# Altium PCB Board1.pcbdoc (part 1 of 2)
Units mil, origin at the board's own origin, x right, y up, seen from the top; angles counter-clockwise.
Board outline 3515.7 x 2641.7 mil, 2 copper layers (Top Layer, Bottom Layer), stack 62.2 mil thick; 78 components, 74 nets, 384 pads, 165 vias.
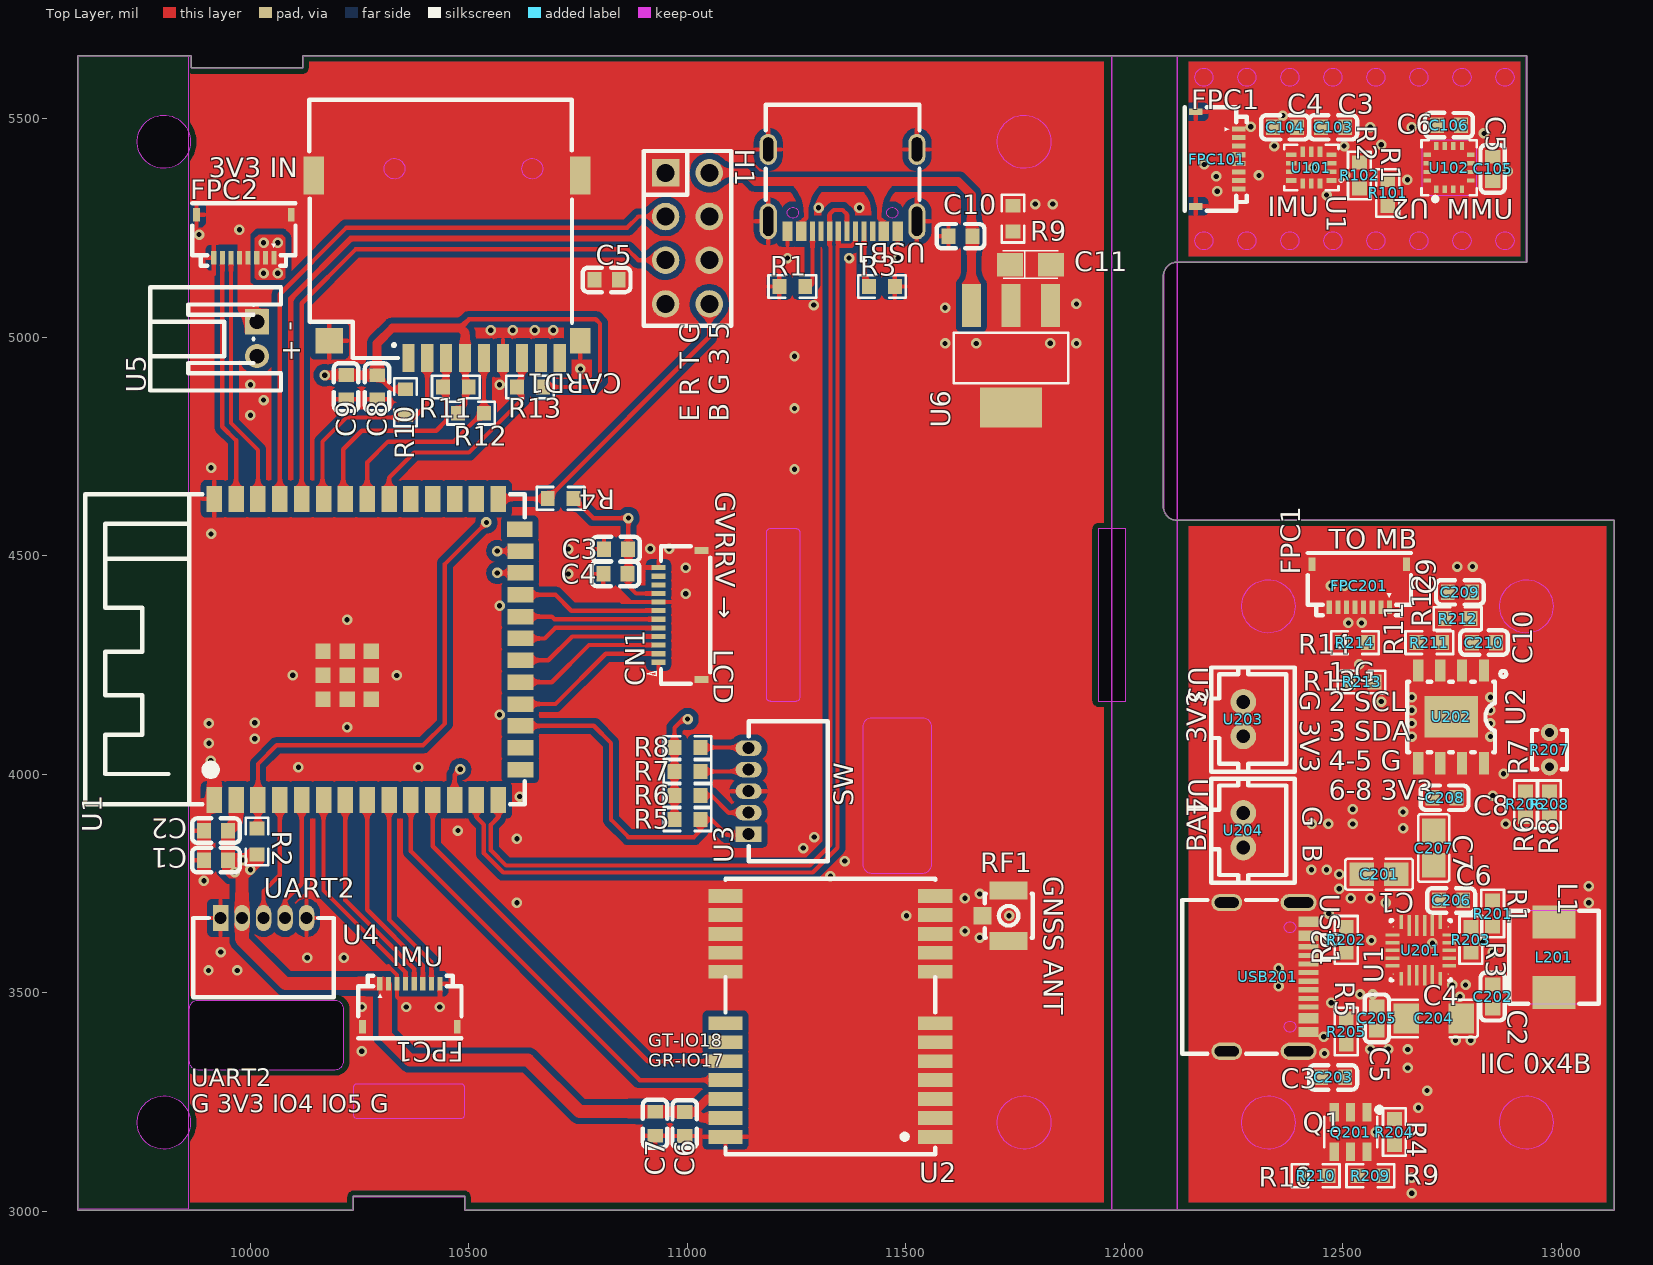
[diagram p0: Top Layer view]
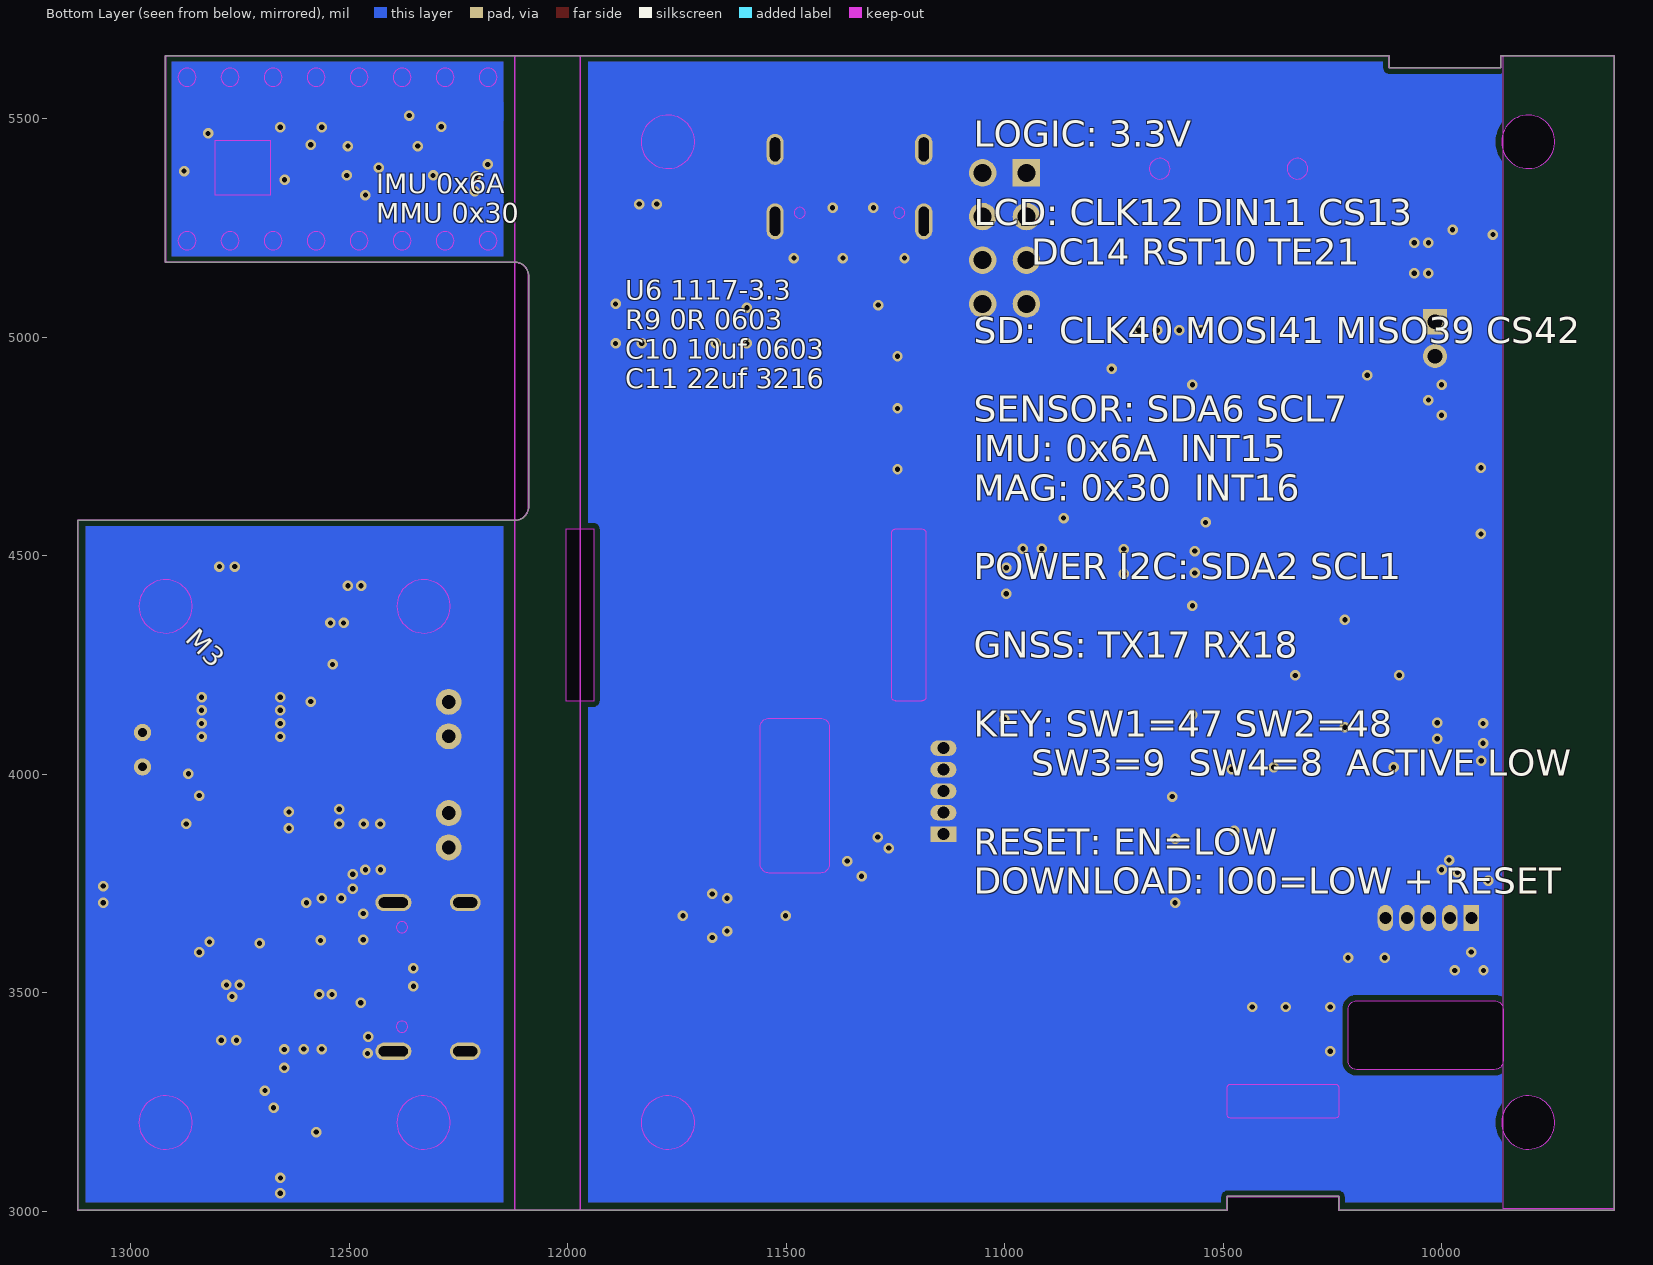
[diagram p1: Bottom Layer view, seen from below]

## Layer stack, top to bottom
Top Solder Mask Layer: solder mask 0.4, Dk 3.3
Top Layer: signal copper 1.4
Dielectric1: surface 59.4, FR4, Dk 4.5
Bottom Layer: signal copper 1.4
Bottom Solder Mask Layer: solder mask 0.4, Dk 3.3

## Board outline
9605,3002 9605,5643.7 9864.3,5643.7 9864.3,5616.1 10120.2,5616.1 10120.2,5643.7 12920,5643.7 12920,5171.3 12120.7,5171.3 ccw(c12120.7,5139.8) 12089.3,5139.8 12089.3,4612.2 ccw(c12120.7,4612.2) 12120.7,4580.7 13120.7,4580.7 13120.7,3002 10490.8,3002 10490.8,3033.5 10234.9,3033.5 10234.9,3002
cut-out: 9879,3481.5 ccw(c9879,3461.8) 9859.3,3461.8 9859.3,3343.7 ccw(c9879,3343.7) 9879,3324 10194,3324 ccw(c10194,3343.7) 10213.7,3343.7 10213.7,3461.8 ccw(c10194,3461.8) 10194,3481.5 9879,3481.5
cut-out: 11401.3,3793.4 ccw(c11420.9,3793.4) 11420.9,3773.7 11539.1,3773.7 ccw(c11539.1,3793.4) 11558.7,3793.4 11558.7,4108.4 ccw(c11539.1,4108.4) 11539.1,4128.1 11420.9,4128.1 ccw(c11420.9,4108.4) 11401.3,4108.4 11401.3,3793.4
cut-out: 11189.6,4561 ccw(c11189.6,4551.2) 11179.8,4551.2 11179.8,4177.2 ccw(c11189.6,4177.2) 11189.6,4167.3 11248.7,4167.3 ccw(c11248.7,4177.2) 11258.5,4177.2 11258.5,4551.2 ccw(c11248.7,4551.2) 11248.7,4561 11189.6,4561
cut-out: 10244.8,3290.9 ccw(c10244.8,3281.1) 10235,3281.1 10235,3222 ccw(c10244.8,3222) 10244.8,3212.2 10481.1,3212.2 ccw(c10481.1,3222) 10490.9,3222 10490.9,3281.1 ccw(c10481.1,3281.1) 10481.1,3290.9 10244.8,3290.9
cut-out: 11939.6,4561 11939.6,4167.3 12002.6,4167.3 12002.6,4561
cut-out: 9862.9,3202.8 9862.5,3195.8 9861.3,3188.9 9859.3,3182.2 9856.6,3175.8 9853.2,3169.8 9849.1,3164.1 9844.4,3159 9839.1,3154.4 9833.4,3150.5 9827.2,3147.2 9820.7,3144.7 9814,3142.9 9807.1,3142 9800.1,3141.8 9793.2,3142.4 9786.3,3143.7 9779.7,3145.9 9773.4,3148.8 9767.4,3152.4 9761.9,3156.6 9756.9,3161.5 9752.5,3166.9 9748.7,3172.7 9745.6,3179 9743.3,3185.6 9741.7,3192.4 9740.9,3199.3 9740.9,3206.2 9741.7,3213.2 9743.3,3219.9 9745.6,3226.5 9748.7,3232.8 9752.5,3238.6 9756.9,3244 9761.9,3248.9 9767.4,3253.1 9773.4,3256.7 9779.7,3259.6 9786.3,3261.8 9793.2,3263.2 9800.1,3263.8 9807.1,3263.6 9814,3262.6 9820.7,3260.8 9827.2,3258.3 9833.4,3255 9839.1,3251.1 9844.4,3246.5 9849.1,3241.4 9853.2,3235.7 9856.6,3229.7 9859.3,3223.3 9861.3,3216.6 9862.5,3209.7
cut-out: 9862.9,5446.9 9862.5,5439.9 9861.3,5433 9859.3,5426.3 9856.6,5419.9 9853.2,5413.9 9849.1,5408.2 9844.4,5403.1 9839.1,5398.5 9833.4,5394.6 9827.2,5391.3 9820.7,5388.8 9814,5387 9807.1,5386.1 9800.1,5385.9 9793.2,5386.4 9786.3,5387.8 9779.7,5390 9773.4,5392.9 9767.4,5396.5 9761.9,5400.7 9756.9,5405.6 9752.5,5411 9748.7,5416.8 9745.6,5423.1 9743.3,5429.7 9741.7,5436.4 9740.9,5443.4 9740.9,5450.3 9741.7,5457.3 9743.3,5464 9745.6,5470.6 9748.7,5476.9 9752.5,5482.7 9756.9,5488.1 9761.9,5493 9767.4,5497.2 9773.4,5500.8 9779.7,5503.7 9786.3,5505.9 9793.2,5507.3 9800.1,5507.8 9807.1,5507.7 9814,5506.7 9820.7,5504.9 9827.2,5502.4 9833.4,5499.1 9839.1,5495.2 9844.4,5490.6 9849.1,5485.5 9853.2,5479.8 9856.6,5473.8 9859.3,5467.4 9861.3,5460.7 9862.5,5453.8
cut-out: 11831.4,3202.8 11831,3195.8 11829.8,3188.9 11827.8,3182.2 11825.1,3175.8 11821.7,3169.8 11817.6,3164.1 11812.9,3159 11807.6,3154.4 11801.9,3150.5 11795.7,3147.2 11789.2,3144.7 11782.5,3142.9 11775.6,3142 11768.6,3141.8 11761.7,3142.4 11754.8,3143.7 11748.2,3145.9 11741.9,3148.8 11735.9,3152.4 11730.4,3156.6 11725.4,3161.5 11721,3166.9 11717.2,3172.7 11714.1,3179 11711.8,3185.6 11710.2,3192.4 11709.4,3199.3 11709.4,3206.2 11710.2,3213.2 11711.8,3219.9 11714.1,3226.5 11717.2,3232.8 11721,3238.6 11725.4,3244 11730.4,3248.9 11735.9,3253.1 11741.9,3256.7 11748.2,3259.6 11754.8,3261.8 11761.7,3263.2 11768.6,3263.8 11775.6,3263.6 11782.5,3262.6 11789.2,3260.8 11795.7,3258.3 11801.9,3255 11807.6,3251.1 11812.9,3246.5 11817.6,3241.4 11821.7,3235.7 11825.1,3229.7 11827.8,3223.3 11829.8,3216.6 11831,3209.7
cut-out: 11831.4,5446.9 11831,5439.9 11829.8,5433 11827.8,5426.3 11825.1,5419.9 11821.7,5413.9 11817.6,5408.2 11812.9,5403.1 11807.6,5398.5 11801.9,5394.6 11795.7,5391.3 11789.2,5388.8 11782.5,5387 11775.6,5386.1 11768.6,5385.9 11761.7,5386.4 11754.8,5387.8 11748.2,5390 11741.9,5392.9 11735.9,5396.5 11730.4,5400.7 11725.4,5405.6 11721,5411 11717.2,5416.8 11714.1,5423.1 11711.8,5429.7 11710.2,5436.4 11709.4,5443.4 11709.4,5450.3 11710.2,5457.3 11711.8,5464 11714.1,5470.6 11717.2,5476.9 11721,5482.7 11725.4,5488.1 11730.4,5493 11735.9,5497.2 11741.9,5500.8 11748.2,5503.7 11754.8,5505.9 11761.7,5507.3 11768.6,5507.8 11775.6,5507.7 11782.5,5506.7 11789.2,5504.9 11795.7,5502.4 11801.9,5499.1 11807.6,5495.2 11812.9,5490.6 11817.6,5485.5 11821.7,5479.8 11825.1,5473.8 11827.8,5467.4 11829.8,5460.7 11831,5453.8
cut-out: 12390.4,3202.8 12390,3195.8 12388.8,3188.9 12386.9,3182.2 12384.2,3175.8 12380.7,3169.8 12376.7,3164.1 12371.9,3159 12366.7,3154.4 12360.9,3150.5 12354.8,3147.2 12348.3,3144.7 12341.5,3142.9 12334.6,3142 12327.7,3141.8 12320.7,3142.4 12313.9,3143.7 12307.3,3145.9 12300.9,3148.8 12295,3152.4 12289.4,3156.6 12284.5,3161.5 12280,3166.9 12276.3,3172.7 12273.2,3179 12270.9,3185.6 12269.3,3192.4 12268.5,3199.3 12268.5,3206.2 12269.3,3213.2 12270.9,3219.9 12273.2,3226.5 12276.3,3232.8 12280,3238.6 12284.5,3244 12289.4,3248.9 12295,3253.1 12300.9,3256.7 12307.3,3259.6 12313.9,3261.8 12320.7,3263.2 12327.7,3263.8 12334.6,3263.6 12341.5,3262.6 12348.3,3260.8 12354.8,3258.3 12360.9,3255 12366.7,3251.1 12371.9,3246.5 12376.7,3241.4 12380.7,3235.7 12384.2,3229.7 12386.9,3223.3 12388.8,3216.6 12390,3209.7
cut-out: 12390.4,4383.9 12390,4376.9 12388.8,4370 12386.9,4363.4 12384.2,4356.9 12380.7,4350.9 12376.7,4345.2 12371.9,4340.1 12366.7,4335.5 12360.9,4331.6 12354.8,4328.3 12348.3,4325.8 12341.5,4324.1 12334.6,4323.1 12327.7,4322.9 12320.7,4323.5 12313.9,4324.8 12307.3,4327 12300.9,4329.9 12295,4333.5 12289.4,4337.7 12284.5,4342.6 12280,4348 12276.3,4353.9 12273.2,4360.1 12270.9,4366.7 12269.3,4373.5 12268.5,4380.4 12268.5,4387.3 12269.3,4394.3 12270.9,4401.1 12273.2,4407.6 12276.3,4413.9 12280,4419.7 12284.5,4425.1 12289.4,4430 12295,4434.2 12300.9,4437.8 12307.3,4440.7 12313.9,4442.9 12320.7,4444.3 12327.7,4444.9 12334.6,4444.7 12341.5,4443.7 12348.3,4441.9 12354.8,4439.4 12360.9,4436.1 12366.7,4432.2 12371.9,4427.6 12376.7,4422.5 12380.7,4416.9 12384.2,4410.8 12386.9,4404.4 12388.8,4397.7 12390,4390.8
cut-out: 12981,3202.8 12980.6,3195.8 12979.4,3188.9 12977.4,3182.2 12974.7,3175.8 12971.3,3169.8 12967.2,3164.1 12962.5,3159 12957.2,3154.4 12951.5,3150.5 12945.3,3147.2 12938.8,3144.7 12932.1,3142.9 12925.2,3142 12918.2,3141.8 12911.3,3142.4 12904.4,3143.7 12897.8,3145.9 12891.5,3148.8 12885.5,3152.4 12880,3156.6 12875,3161.5 12870.6,3166.9 12866.8,3172.7 12863.8,3179 12861.4,3185.6 12859.8,3192.4 12859,3199.3 12859,3206.2 12859.8,3213.2 12861.4,3219.9 12863.8,3226.5 12866.8,3232.8 12870.6,3238.6 12875,3244 12880,3248.9 12885.5,3253.1 12891.5,3256.7 12897.8,3259.6 12904.4,3261.8 12911.3,3263.2 12918.2,3263.8 12925.2,3263.6 12932.1,3262.6 12938.8,3260.8 12945.3,3258.3 12951.5,3255 12957.2,3251.1 12962.5,3246.5 12967.2,3241.4 12971.3,3235.7 12974.7,3229.7 12977.4,3223.3 12979.4,3216.6 12980.6,3209.7
cut-out: 12981,4383.9 12980.6,4376.9 12979.4,4370 12977.4,4363.4 12974.7,4356.9 12971.3,4350.9 12967.2,4345.2 12962.5,4340.1 12957.2,4335.5 12951.5,4331.6 12945.3,4328.3 12938.8,4325.8 12932.1,4324.1 12925.2,4323.1 12918.2,4322.9 12911.3,4323.5 12904.4,4324.8 12897.8,4327 12891.5,4329.9 12885.5,4333.5 12880,4337.7 12875,4342.6 12870.6,4348 12866.8,4353.9 12863.8,4360.1 12861.4,4366.7 12859.8,4373.5 12859,4380.4 12859,4387.3 12859.8,4394.3 12861.4,4401.1 12863.8,4407.6 12866.8,4413.9 12870.6,4419.7 12875,4425.1 12880,4430 12885.5,4434.2 12891.5,4437.8 12897.8,4440.7 12904.4,4442.9 12911.3,4444.3 12918.2,4444.9 12925.2,4444.7 12932.1,4443.7 12938.8,4441.9 12945.3,4439.4 12951.5,4436.1 12957.2,4432.2 12962.5,4427.6 12967.2,4422.5 12971.3,4416.9 12974.7,4410.8 12977.4,4404.4 12979.4,4397.7 12980.6,4390.8
cut-out: 12202.4,5594.5 12202,5590.5 12200.9,5586.6 12199,5583 12196.4,5579.9 12193.3,5577.3 12189.7,5575.4 12185.8,5574.2 12181.8,5573.8 12177.7,5574.2 12173.9,5575.4 12170.3,5577.3 12167.2,5579.9 12164.6,5583 12162.7,5586.6 12161.5,5590.5 12161.1,5594.5 12161.5,5598.5 12162.7,5602.4 12164.6,5606 12167.2,5609.1 12170.3,5611.7 12173.9,5613.6 12177.7,5614.8 12181.8,5615.2 12185.8,5614.8 12189.7,5613.6 12193.3,5611.7 12196.4,5609.1 12199,5606 12200.9,5602.4 12202,5598.5
cut-out: 12202.4,5220.5 12202,5216.4 12200.9,5212.6 12199,5209 12196.4,5205.9 12193.3,5203.3 12189.7,5201.4 12185.8,5200.2 12181.8,5199.8 12177.7,5200.2 12173.9,5201.4 12170.3,5203.3 12167.2,5205.9 12164.6,5209 12162.7,5212.6 12161.5,5216.4 12161.1,5220.5 12161.5,5224.5 12162.7,5228.4 12164.6,5232 12167.2,5235.1 12170.3,5237.7 12173.9,5239.6 12177.7,5240.7 12181.8,5241.1 12185.8,5240.7 12189.7,5239.6 12193.3,5237.7 12196.4,5235.1 12199,5232 12200.9,5228.4 12202,5224.5
cut-out: 12891.4,5220.5 12891,5216.4 12889.8,5212.6 12887.9,5209 12885.4,5205.9 12882.2,5203.3 12878.7,5201.4 12874.8,5200.2 12870.7,5199.8 12866.7,5200.2 12862.8,5201.4 12859.3,5203.3 12856.1,5205.9 12853.6,5209 12851.7,5212.6 12850.5,5216.4 12850.1,5220.5 12850.5,5224.5 12851.7,5228.4 12853.6,5232 12856.1,5235.1 12859.3,5237.7 12862.8,5239.6 12866.7,5240.7 12870.7,5241.1 12874.8,5240.7 12878.7,5239.6 12882.2,5237.7 12885.4,5235.1 12887.9,5232 12889.8,5228.4 12891,5224.5
cut-out: 12891.4,5594.5 12891,5590.5 12889.8,5586.6 12887.9,5583 12885.4,5579.9 12882.2,5577.3 12878.7,5575.4 12874.8,5574.2 12870.7,5573.8 12866.7,5574.2 12862.8,5575.4 12859.3,5577.3 12856.1,5579.9 12853.6,5583 12851.7,5586.6 12850.5,5590.5 12850.1,5594.5 12850.5,5598.5 12851.7,5602.4 12853.6,5606 12856.1,5609.1 12859.3,5611.7 12862.8,5613.6 12866.7,5614.8 12870.7,5615.2 12874.8,5614.8 12878.7,5613.6 12882.2,5611.7 12885.4,5609.1 12887.9,5606 12889.8,5602.4 12891,5598.5
cut-out: 12300.9,5220.5 12300.5,5216.4 12299.3,5212.6 12297.4,5209 12294.8,5205.9 12291.7,5203.3 12288.1,5201.4 12284.2,5200.2 12280.2,5199.8 12276.2,5200.2 12272.3,5201.4 12268.7,5203.3 12265.6,5205.9 12263,5209 12261.1,5212.6 12259.9,5216.4 12259.5,5220.5 12259.9,5224.5 12261.1,5228.4 12263,5232 12265.6,5235.1 12268.7,5237.7 12272.3,5239.6 12276.2,5240.7 12280.2,5241.1 12284.2,5240.7 12288.1,5239.6 12291.7,5237.7 12294.8,5235.1 12297.4,5232 12299.3,5228.4 12300.5,5224.5
cut-out: 12399.3,5220.5 12398.9,5216.4 12397.7,5212.6 12395.8,5209 12393.2,5205.9 12390.1,5203.3 12386.5,5201.4 12382.7,5200.2 12378.6,5199.8 12374.6,5200.2 12370.7,5201.4 12367.1,5203.3 12364,5205.9 12361.4,5209 12359.5,5212.6 12358.3,5216.4 12358,5220.5 12358.3,5224.5 12359.5,5228.4 12361.4,5232 12364,5235.1 12367.1,5237.7 12370.7,5239.6 12374.6,5240.7 12378.6,5241.1 12382.7,5240.7 12386.5,5239.6 12390.1,5237.7 12393.2,5235.1 12395.8,5232 12397.7,5228.4 12398.9,5224.5
cut-out: 12497.7,5220.5 12497.3,5216.4 12496.1,5212.6 12494.2,5209 12491.7,5205.9 12488.5,5203.3 12485,5201.4 12481.1,5200.2 12477,5199.8 12473,5200.2 12469.1,5201.4 12465.6,5203.3 12462.4,5205.9 12459.9,5209 12458,5212.6 12456.8,5216.4 12456.4,5220.5 12456.8,5224.5 12458,5228.4 12459.9,5232 12462.4,5235.1 12465.6,5237.7 12469.1,5239.6 12473,5240.7 12477,5241.1 12481.1,5240.7 12485,5239.6 12488.5,5237.7 12491.7,5235.1 12494.2,5232 12496.1,5228.4 12497.3,5224.5
cut-out: 12694.6,5220.5 12694.2,5216.4 12693,5212.6 12691.1,5209 12688.5,5205.9 12685.4,5203.3 12681.8,5201.4 12677.9,5200.2 12673.9,5199.8 12669.9,5200.2 12666,5201.4 12662.4,5203.3 12659.3,5205.9 12656.7,5209 12654.8,5212.6 12653.6,5216.4 12653.2,5220.5 12653.6,5224.5 12654.8,5228.4 12656.7,5232 12659.3,5235.1 12662.4,5237.7 12666,5239.6 12669.9,5240.7 12673.9,5241.1 12677.9,5240.7 12681.8,5239.6 12685.4,5237.7 12688.5,5235.1 12691.1,5232 12693,5228.4 12694.2,5224.5
cut-out: 12793,5220.5 12792.6,5216.4 12791.4,5212.6 12789.5,5209 12786.9,5205.9 12783.8,5203.3 12780.2,5201.4 12776.4,5200.2 12772.3,5199.8 12768.3,5200.2 12764.4,5201.4 12760.8,5203.3 12757.7,5205.9 12755.1,5209 12753.2,5212.6 12752.1,5216.4 12751.7,5220.5 12752.1,5224.5 12753.2,5228.4 12755.1,5232 12757.7,5235.1 12760.8,5237.7 12764.4,5239.6 12768.3,5240.7 12772.3,5241.1 12776.4,5240.7 12780.2,5239.6 12783.8,5237.7 12786.9,5235.1 12789.5,5232 12791.4,5228.4 12792.6,5224.5
cut-out: 12596.1,5220.5 12595.7,5216.4 12594.6,5212.6 12592.7,5209 12590.1,5205.9 12587,5203.3 12583.4,5201.4 12579.5,5200.2 12575.5,5199.8 12571.4,5200.2 12567.6,5201.4 12564,5203.3 12560.9,5205.9 12558.3,5209 12556.4,5212.6 12555.2,5216.4 12554.8,5220.5 12555.2,5224.5 12556.4,5228.4 12558.3,5232 12560.9,5235.1 12564,5237.7 12567.6,5239.6 12571.4,5240.7 12575.5,5241.1 12579.5,5240.7 12583.4,5239.6 12587,5237.7 12590.1,5235.1 12592.7,5232 12594.6,5228.4 12595.7,5224.5
cut-out: 12300.9,5594.5 12300.5,5590.5 12299.3,5586.6 12297.4,5583 12294.8,5579.9 12291.7,5577.3 12288.1,5575.4 12284.2,5574.2 12280.2,5573.8 12276.2,5574.2 12272.3,5575.4 12268.7,5577.3 12265.6,5579.9 12263,5583 12261.1,5586.6 12259.9,5590.5 12259.5,5594.5 12259.9,5598.5 12261.1,5602.4 12263,5606 12265.6,5609.1 12268.7,5611.7 12272.3,5613.6 12276.2,5614.8 12280.2,5615.2 12284.2,5614.8 12288.1,5613.6 12291.7,5611.7 12294.8,5609.1 12297.4,5606 12299.3,5602.4 12300.5,5598.5
cut-out: 12399.3,5594.5 12398.9,5590.5 12397.7,5586.6 12395.8,5583 12393.2,5579.9 12390.1,5577.3 12386.5,5575.4 12382.7,5574.2 12378.6,5573.8 12374.6,5574.2 12370.7,5575.4 12367.1,5577.3 12364,5579.9 12361.4,5583 12359.5,5586.6 12358.3,5590.5 12358,5594.5 12358.3,5598.5 12359.5,5602.4 12361.4,5606 12364,5609.1 12367.1,5611.7 12370.7,5613.6 12374.6,5614.8 12378.6,5615.2 12382.7,5614.8 12386.5,5613.6 12390.1,5611.7 12393.2,5609.1 12395.8,5606 12397.7,5602.4 12398.9,5598.5
cut-out: 12497.7,5594.5 12497.3,5590.5 12496.1,5586.6 12494.2,5583 12491.7,5579.9 12488.5,5577.3 12485,5575.4 12481.1,5574.2 12477,5573.8 12473,5574.2 12469.1,5575.4 12465.6,5577.3 12462.4,5579.9 12459.9,5583 12458,5586.6 12456.8,5590.5 12456.4,5594.5 12456.8,5598.5 12458,5602.4 12459.9,5606 12462.4,5609.1 12465.6,5611.7 12469.1,5613.6 12473,5614.8 12477,5615.2 12481.1,5614.8 12485,5613.6 12488.5,5611.7 12491.7,5609.1 12494.2,5606 12496.1,5602.4 12497.3,5598.5
cut-out: 12596.1,5594.5 12595.7,5590.5 12594.6,5586.6 12592.7,5583 12590.1,5579.9 12587,5577.3 12583.4,5575.4 12579.5,5574.2 12575.5,5573.8 12571.4,5574.2 12567.6,5575.4 12564,5577.3 12560.9,5579.9 12558.3,5583 12556.4,5586.6 12555.2,5590.5 12554.8,5594.5 12555.2,5598.5 12556.4,5602.4 12558.3,5606 12560.9,5609.1 12564,5611.7 12567.6,5613.6 12571.4,5614.8 12575.5,5615.2 12579.5,5614.8 12583.4,5613.6 12587,5611.7 12590.1,5609.1 12592.7,5606 12594.6,5602.4 12595.7,5598.5
cut-out: 12694.6,5594.5 12694.2,5590.5 12693,5586.6 12691.1,5583 12688.5,5579.9 12685.4,5577.3 12681.8,5575.4 12677.9,5574.2 12673.9,5573.8 12669.9,5574.2 12666,5575.4 12662.4,5577.3 12659.3,5579.9 12656.7,5583 12654.8,5586.6 12653.6,5590.5 12653.2,5594.5 12653.6,5598.5 12654.8,5602.4 12656.7,5606 12659.3,5609.1 12662.4,5611.7 12666,5613.6 12669.9,5614.8 12673.9,5615.2 12677.9,5614.8 12681.8,5613.6 12685.4,5611.7 12688.5,5609.1 12691.1,5606 12693,5602.4 12694.2,5598.5
cut-out: 12793,5594.5 12792.6,5590.5 12791.4,5586.6 12789.5,5583 12786.9,5579.9 12783.8,5577.3 12780.2,5575.4 12776.4,5574.2 12772.3,5573.8 12768.3,5574.2 12764.4,5575.4 12760.8,5577.3 12757.7,5579.9 12755.1,5583 12753.2,5586.6 12752.1,5590.5 12751.7,5594.5 12752.1,5598.5 12753.2,5602.4 12755.1,5606 12757.7,5609.1 12760.8,5611.7 12764.4,5613.6 12768.3,5614.8 12772.3,5615.2 12776.4,5614.8 12780.2,5613.6 12783.8,5611.7 12786.9,5609.1 12789.5,5606 12791.4,5602.4 12792.6,5598.5

## Design rules (kind name [scope] priority, off if disabled: settings)
BoardOutlineClearance copperThickness1oz [All] p0: genericclearance=10 ignorepadtopadclearanceinfootprint=FALSE except(0: Arc-SplitContinuation Track-SplitContinuation SMDPad-SplitContinuation THPad-SplitContinuation Via-SplitContinuation Fill-SplitContinuation Poly-SplitContinuation Region-SplitContinuation Text-SplitContinuation)
BoardOutlineClearance copperThickness2oz [All] p0: genericclearance=10 ignorepadtopadclearanceinfootprint=FALSE except(0: Arc-SplitContinuation Track-SplitContinuation SMDPad-SplitContinuation THPad-SplitContinuation Via-SplitContinuation Fill-SplitContinuation Poly-SplitContinuation Region-SplitContinuation Text-SplitContinuation)
BoardOutlineClearance otherClearance [All] p0: genericclearance=10 ignorepadtopadclearanceinfootprint=FALSE except(0: Arc-SplitContinuation Track-SplitContinuation SMDPad-SplitContinuation THPad-SplitContinuation Via-SplitContinuation Fill-SplitContinuation Poly-SplitContinuation Region-SplitContinuation Text-SplitContinuation)
Clearance copperThickness1oz [All] p1: gap=7 ignorepadtopadclearanceinfootprint=FALSE
Clearance copperThickness2oz [All] p1: gap=7 ignorepadtopadclearanceinfootprint=FALSE
Clearance otherClearance [All] p1: gap=7 ignorepadtopadclearanceinfootprint=FALSE
DiffPairsRouting differentialPair [All] p1: maxuncoupledlength=10 minlimit=6 maxlimit=Infinity mostfreqgap=6 toplayer_minwidth=5 toplayer_prefwidth=10 toplayer_maxwidth=100 bottomlayer_minwidth=5 bottomlayer_prefwidth=10 bottomlayer_maxwidth=100
PasteMaskExpansion pasteMaskExpansion [All] p1: expansion=0
PlaneConnect innerPlane [All] p1: planeconnectstyle=Relief reliefexpansion=20 reliefentries=4 reliefconductorwidth=10 reliefairgap=10
PolygonConnect copperRegion [All] p1: connectstyle=Relief reliefentries=4 reliefconductorwidth=10 polygonreliefangle="90 Angle" airgapwidth=10
PolygonConnect copperRegion1 [All] p1: connectstyle=Direct reliefentries=4 reliefconductorwidth=10 polygonreliefangle="90 Angle" airgapwidth=10
RoutingVias viaSize [All] p1: viastyle="Through Hole" holewidth=12.0078 minholewidth=11.811 maxholewidth=248.0314 width=12.0078 minwidth=11.811 maxwidth=248.0314
SolderMaskExpansion solderMaskExpansion [IsVia] p1: useseparateexpansions=TRUE expansion=-1000 expansionbottom=-1000
SolderMaskExpansion solderMaskExpansion [All] p2: useseparateexpansions=TRUE expansion=2 expansionbottom=2
Width copperThickness1oz [All] p1: maxlimit=100 minlimit=5 preferedwidth=10
Width copperThickness2oz [All] p1: maxlimit=100 minlimit=8 preferedwidth=10

## Components (designator, comment, footprint, x,y, rotation, side; value= is the part's Value field where it differs from the comment)
C1 "10uF" C0603#1 9921.2,3803.2 r180 top
C2 "100nF" C0603#1 9921.2,3870.8 r180 top
C3 "100nF" C0603#1 10836.6,4515 r0 top
C4 "10uF" C0603#2 10835.4,4458 r0 top
C5 "10uF" C0603#3 10815,5130.9 r0 top
C6 "100nF" C0603#1 10993.7,3199.4 r90 top
C7 "10uF" C0603#2 10926,3200.1 r90 top
C8 "10uF" C0603#3 10289.9,4885.3 r90 top
C9 "100nF" C0603#2 10218.9,4885.6 r90 top
C10 "10uF" C0603#3 11625,5230.9 r0 top
C11 "22uF" CASE-A_3216 11785,5165.9 r0 top
C103 "100nF" C0603#2 12477.6,5480 r0 top
C104 "100nF" C0603#1 12367.6,5480 r180 top
C105 "1uF" C0603#3 12842.6,5385 r270 top
C106 "10uF" C0603#2 12742.6,5485 r0 top
C201 "22uF" C0805#1 12582.6,3770.9 r180 top
C202 "47nF" C0603#3 12842.6,3490.9 r90 top
C203 "1uF" C0603#1 12477.6,3305.9 r180 top
C204 "10uF" C1206 12707.6,3440.9 r0 top
C205 "1uF" C0603#3 12577.6,3440.9 r90 top
C206 "10uF" C0603#1 12747.6,3710.9 r180 top
C207 "22uF" C0805#2 12707.6,3830.9 r270 top
C208 "2.2uF" C0603#2 12732.6,3945.9 r0 top
C209 "100pF" C0603#2 12767.6,4415.9 r0 top
C210 "2.2uF" C0603#1 12822.6,4300.9 r180 top
CARD1 "TF PUSH" TF-SMD_TF-PUSH 10450,5160.9 r180 top
CN1 "HC-FPC-05-09-12RLTAG" CONN-SMD_12P-P0.50_HCTL_HC-FPC-05-09-12RLTAG 10983,4364.2 r90 top
FPC1 "HC-FPC-05-09-8RLTAG" FPC-SMD_8P-P0.50_HC-FPC-05-09-8RLTAG#1 10365,3470.9 r180 top
FPC2 "HC-FPC-05-09-8RLTAG" FPC-SMD_8P-P0.50_HC-FPC-05-09-8RLTAG#1 9985,5230.9 r0 top
FPC101 "HC-FPC-05-09-8RLTAG" FPC-SMD_8P-P0.50_HC-FPC-05-09-8RLTAG#2 12212.6,5407.5 r90 top
FPC201 "HC-FPC-05-09-8RLTAG" FPC-SMD_8P-P0.50_HC-FPC-05-09-8RLTAG#3 12537.6,4430.9 r0 top
H1 "LAIL-PZ2.54-4PX2-L" HDR-TH_LAIL-PZ2.54-4PX2-L 11000,5225.9 r270 top
L201 "1uH" IND-SMD_L5.4-W5.2_FXL0530 12982.6,3580.9 r270 top
Q201 "CH221K" SOT-23-6_L2.9-W1.6-P0.95-LS2.8-BL-2 12517.6,3180.9 r180 top
R1 "5.1kΩ" R0603#1 11240,5115.9 r180 top
R2 "10kΩ" R0603#1 10015,3845.9 r270 top
R3 "5.1kΩ" R0603#1 11445,5115.9 r0 top
R4 "10kΩ" R0603#1 10710,4630.9 r180 top
R5 "10kΩ" R0603#1 11000,3895.9 r0 top
R6 "10kΩ" R0603#1 11000,3950.9 r0 top
R7 "10kΩ" R0603#1 11000,4005.9 r0 top
R8 "10kΩ" R0603#1 11000,4060.9 r0 top
R9 "0Ω" R0603#1 11745,5270.9 r270 top
R10 "10kΩ" R0603#1 10355,4850.9 r90 top
R11 "10kΩ" R0603#1 10470,4885.9 r0 top
R12 "10kΩ" R0603#1 10505,4825.9 r180 top
R13 "10kΩ" R0603#1 10640,4885.9 r0 top
R101 "4.7kΩ" R0603#1 12602.6,5330 r270 top
R102 "4.7kΩ" R0603#1 12537.6,5370 r270 top
R201 "100kΩ" R0603#1 12842.6,3680.9 r270 top
R202 "68kΩ" R0603#1 12507.6,3620.9 r90 top
R203 "12kΩ" R0603#1 12792.6,3620.9 r270 top
R204 "20kΩ" R0603#1 12617.6,3180.9 r90 top
R205 "1kΩ" R0603#1 12507.6,3410.9 r90 top
R206 "3kΩ" R0603#1 12917.6,3930.9 r90 top
R207 "WH103AT3950F-2" RES-TH_L2.0-W2.0-P2.00-D0.4 12972.6,4055.9 r90 top
R208 "10kΩ" R0603#1 12972.6,3930.9 r270 top
R209 "5.1kΩ" R0603#2 12562.6,3080.9 r0 top
R210 "5.1kΩ" R0603#3 12437.6,3080.9 r180 top
R211 "100kΩ" R0603#2 12697.6,4300.9 r0 top
R212 "120kΩ" R0603#2 12762.6,4355.9 r0 top
R213 "4.7kΩ" R0603#2 12542.6,4210.9 r0 top
R214 "4.7kΩ" R0603#2 12527.6,4300.9 r0 top
RF1 "6GHz" IPEX-SMD_BWIPX-1-001E 11705,3675.9 r0 top
U1 "2.4GHz" WIRELM-SMD_ESP32-S3-WROOM-1 10267.5,4285.4 r90 top
U2 "ATGM332D-F8N76" GPS-SMD_ATGM332D-6S74 11327.2,3445.4 r0 top
U3 "BX-MX1.25-5PWZ" CONN-TH_5P-P1.25_BX-MX1.25-5PWZ 11140,3960.9 r90 top
U4 "BX-MX1.25-5PWZ" CONN-TH_5P-P1.25_BX-MX1.25-5PWZ 10030,3670.9 r0 top
U5 "S2B-PH-K-S(LF)(SN)" CONN-TH_S2B-PH-K-S-LF-SN 10015,4995.9 r90 top
U6 "AMS1117-3.3" SOT-223-3_L6.5-W3.4-P2.30-LS7.0-BR 11740.4,4955.9 r90 top
U101 "LSM6DSV16XTR" LGA-14_L3.0-W2.5-P0.50-BR 12427.8,5387.8 r0 top
U102 "MMC5983MA" LGA-16_L3.0-W3.0-P0.50-BL_SQ 12742.8,5387.8 r0 top
U201 "MP2731GQC-0001-Z" QFN-26_L3.5-W3.5-P0.45-TL_MP2733GQC 12678.1,3596.5 r90 top
U202 "MP20045DN-LF-Z" SOIC-8_L4.9-W3.9-P1.27-LS6.0-TL-EP-2 12747.6,4130.9 r270 top
U203 "WAFER-PH2.0-2PZZ" CONN-TH_2P-P2.00_HC-PH-2A-M#1 12271.9,4125.9 r270 top
U204 "WAFER-PH2.0-2PZZ" CONN-TH_2P-P2.00_HC-PH-2A-M#2 12271.9,3871.5 r270 top
USB1 "LAIL-TYPE-C-16PIN-08-WT" TYPE-C-SMD_LAIL-TYPE-C-16PIN-08-WT#1 11355,5335.9 r180 top
USB201 "LAIL-TYPE-C-16PIN-08-WT" TYPE-C-SMD_LAIL-TYPE-C-16PIN-08-WT#2 12327.6,3535.9 r270 top

## Footprints (in the part's own frame and the unit in brackets; to place one, negate y for a bottom-side part, rotate by r counter-clockwise, add the part's x,y. Pads: shape width x height; smd on the part's side, far side on the other; paste and mask are expansions set on the pad)
C0603#1 [mil]
  rect 31.5x35.4 smd: 1(-27.5,0) 2(27.6,0)
  silkscreen extent -55,-28 55,28
C0603#2 [mil]
  rect 31.5x35.4 smd: 1(-27.6,0) 2(27.5,0)
  silkscreen extent -55,-28 55,28
C0603#3 [mil]
  rect 31.5x35.4 smd: 1(-27.6,0) 2(27.6,0)
  silkscreen extent -55,-28 55,28
C0805#1 [mil]
  rect 55.5x53.1 smd paste-3937 mask+2: 1(-39.3,0) 2(39.4,0)
  silkscreen extent -77,-36 77,36
C0805#2 [mil]
  rect 55.5x53.1 smd paste-3937 mask+2: 1(-39.4,0) 2(39.4,0)
  silkscreen extent -77,-36 77,36
C1206 [mil]
  rect 58.5x68 smd paste-3937 mask+2: 1(-62.7,0) 2(62.7,0)
  silkscreen extent -101,-43 101,43
CASE-A_3216 [mil]
  rect 59.1x53.5 smd: 1(-47.2,0) 2(47.2,0)
  silkscreen extent -63,-32 63,32
CONN-SMD_12P-P0.50_HCTL_HC-FPC-05-09-12RLTAG [mil]
  rect 11.8x31.5 smd paste+0 mask+2: 1(-108.3,49.3) 2(-88.6,49.3) 3(-68.9,49.3) 4(-49.2,49.3) 5(-29.6,49.3) 6(-9.9,49.3) 7(9.8,49.3) 8(29.5,49.3) 9(49.2,49.3) 10(68.9,49.3) 11(88.6,49.3) 12(108.2,49.3)
  rect 15.7x31.5 smd paste+0 mask+2: 13(147.6,-49.2) 14(-147.7,-49.2)
  silkscreen extent -158,-69 158,74
CONN-TH_2P-P2.00_HC-PH-2A-M#1 [mil]
  round 59.1 hole 31.5 paste+0 mask+2: 1(-39.4,0) 2(39.4,0)
  silkscreen extent -118,-73 120,118
CONN-TH_2P-P2.00_HC-PH-2A-M#2 [mil]
  round 59.1 hole 31.5 paste+0 mask+2: 1(-39.4,0) 2(39.3,0)
  silkscreen extent -118,-73 120,118
CONN-TH_5P-P1.25_BX-MX1.25-5PWZ [mil]
  rect 35.4x60 hole 27.6: 1(-98.4,0)
  oval 35.4x60 hole 27.6: 2(-49.2,0) 3(0,0) 4(49.2,0) 5(98.4,0)
  silkscreen extent -160,-181 160,0
CONN-TH_S2B-PH-K-S-LF-SN [mil]
  rect 59.1x55.1 hole 33.5: 1(39.4,0)
  round 55.1 hole 33.5: 2(-39.4,0)
  silkscreen extent -118,-55 118,244
FPC-SMD_8P-P0.50_HC-FPC-05-09-8RLTAG#1 [mil]
  rect 11.8x31.5 smd paste+0 mask+2: 1(68.9,-49.2) 2(49.2,-49.2) 3(29.5,-49.2) 4(9.8,-49.2) 5(-9.8,-49.2) 6(-29.5,-49.2) 7(-49.2,-49.2) 8(-68.9,-49.2)
  rect 15.7x31.5 smd paste+0 mask+2: 9(-108.3,49.2) 10(108.3,49.2)
  silkscreen extent -118,-67 118,75
FPC-SMD_8P-P0.50_HC-FPC-05-09-8RLTAG#2 [mil]
  rect 11.8x31.5 smd paste+0 mask+2: 1(68.9,-49.2) 2(49.2,-49.2) 3(29.5,-49.2) 4(9.8,-49.2) 5(-9.9,-49.2) 6(-29.5,-49.2) 7(-49.2,-49.2) 8(-68.9,-49.2)
  rect 15.7x31.5 smd paste+0 mask+2: 9(-108.3,49.3) 10(108.3,49.3)
  silkscreen extent -118,-67 118,75
FPC-SMD_8P-P0.50_HC-FPC-05-09-8RLTAG#3 [mil]
  rect 11.8x31.5 smd paste+0 mask+2: 1(68.9,-49.2) 2(49.2,-49.2) 3(29.5,-49.2) 4(9.8,-49.2) 5(-9.9,-49.2) 6(-29.6,-49.2) 7(-49.3,-49.2) 8(-68.9,-49.2)
  rect 15.7x31.5 smd paste+0 mask+2: 9(-108.3,49.2) 10(108.2,49.2)
  silkscreen extent -118,-67 118,75
GPS-SMD_ATGM332D-6S74 [mil]
  rect 78.7x31.5 smd paste+0 mask+2: 1(240.2,-275.6) 2(240.2,-232.3) 3(240.2,-188.9) 4(240.2,-145.6) 5(240.2,-102.3) 6(240.2,-59) 7(240.2,-15.7) 8(240.2,102.4) 9(240.2,145.7) 10(240.2,189) 11(240.2,232.3) 12(240.2,275.6) 13(-240.1,275.6) 14(-240.1,232.3) 15(-240.1,189) 16(-240.1,145.7) 17(-240.1,102.4) 18(-240.1,-15.7) 19(-240.1,-59) 20(-240.1,-102.3) 21(-240.1,-145.6) 22(-240.1,-188.9) 23(-240.1,-232.3) 24(-240.1,-275.6)
  silkscreen extent -240,-315 240,315
HDR-TH_LAIL-PZ2.54-4PX2-L [mil]
  rect 63x63 hole 41.3 paste+0 mask+2: 1(-150,-50)
  round 63 hole 41.3 paste+0 mask+2: 2(-150,50) 3(-50,-50) 4(-50,50) 5(50,-50) 6(50,50) 7(150,-50) 8(150,50)
  silkscreen extent -200,-100 200,100
IND-SMD_L5.4-W5.2_FXL0530 [mil]
  rect 74.8x98.4 smd: 1(-80.7,0) 2(80.7,0)
  silkscreen extent -106,-102 106,102
IPEX-SMD_BWIPX-1-001E [mil]
  rect 41.3x39.4 smd: 1(-30,0)
  rect 86.6x41.3 smd: 2(30,-58.1) 3(30,58.1)
  silkscreen extent -25,-50 85,50
LGA-14_L3.0-W2.5-P0.50-BR [mil]
  rect 23.6x10.6 smd: 1(46.1,-29.5) 2(46.1,-9.8) 3(46.1,9.9) 4(46.1,29.5) 8(-46,29.5) 9(-46,9.9) 10(-46,-9.8) 11(-46,-29.5)
  rect 10.6x23.6 smd: 5(19.7,36.2) 6(0,36.2) 7(-19.7,36.2) 12(-19.7,-36.2) 13(0,-36.2) 14(19.7,-36.2)
  silkscreen extent -62,-52 71,52
LGA-16_L3.0-W3.0-P0.50-BL_SQ [mil]
  rect 9.8x17.7 smd: 1(-29.5,-49.7) 2(-9.8,-49.7) 3(9.8,-49.7) 4(29.5,-49.7) 9(29.5,49.7) 10(9.8,49.7) 11(-9.8,49.7) 12(-29.5,49.7)
  rect 17.7x9.8 smd: 5(49.7,-29.5) 6(49.7,-9.8) 7(49.7,9.8) 8(49.7,29.5) 13(-49.7,29.5) 14(-49.7,9.8) 15(-49.7,-9.8) 16(-49.7,-29.5)
  silkscreen extent -63,-77 63,63
QFN-26_L3.5-W3.5-P0.45-TL_MP2733GQC [mil]
  rect 31.5x7.9 smd paste-3937 mask+2: 1(-65,44.3) 6(-65,-44.3) 14(64.9,-44.3) 19(64.9,44.3)
  rect 47.2x7.9 smd paste-3937 mask+2: 2(-57.1,26.6) 3(-57.1,8.8) 4(-57.1,-8.9) 5(-57.1,-26.6) 15(57.1,-26.6) 16(57.1,-8.9) 17(57.1,8.8) 18(57.1,26.6)
  round 3 smd: 7(-54.2,-62.9) 13(54.1,-62.9) 20(54.1,62.8) 26(-54.2,62.8)
  rect 7.9x31.5 smd paste-3937 mask+2: 8(-35.5,-65) 9(-17.7,-65) 10(0,-65) 11(17.7,-65) 12(35.4,-65) 21(35.4,64.9) 22(17.7,64.9) 23(0,64.9) 24(-17.7,64.9) 25(-35.5,64.9)
  Top Layer region: 61,48.2 49.2,48.2 49.2,80.7 57.1,80.7 57.1,61 61,61
  Top Layer region: 61,-48.2 49.2,-48.2 49.2,-80.7 57.1,-80.7 57.1,-61 61,-61
  Top Layer region: -61.1,48.2 -49.3,48.2 -49.3,80.7 -57.1,80.7 -57.1,61 -61.1,61
  Top Layer region: -61.1,-48.2 -49.3,-48.2 -49.3,-80.7 -57.1,-80.7 -57.1,-61 -61.1,-61
  silkscreen extent -69,-69 69,69
R0603#1 [mil]
  rect 31.8x34 smd paste-3937 mask+2: 1(-29.7,0) 2(29.7,0)
  silkscreen extent -54,-26 54,26
R0603#2 [mil]
  rect 31.8x34 smd paste-3937 mask+2: 1(-29.7,0) 2(29.6,0)
  silkscreen extent -55,-26 54,26
R0603#3 [mil]
  rect 31.8x34 smd paste-3937 mask+2: 1(-29.6,0) 2(29.7,0)
  silkscreen extent -54,-26 55,26
RES-TH_L2.0-W2.0-P2.00-D0.4 [mil]
  round 39.4 hole 19.7 paste+0 mask+2: 1(-39.4,0) 2(39.4,0)
  silkscreen extent -45,-40 45,40
SOIC-8_L4.9-W3.9-P1.27-LS6.0-TL-EP-2 [mm]
  rect 1.3x0.599 smd: 1(-2.7,1.905) 2(-2.7,0.635) 3(-2.7,-0.635) 4(-2.7,-1.905) 5(2.7,-1.905) 6(2.7,-0.635) 7(2.7,0.635) 8(2.7,1.905)
  rect 2.41x3.099 smd: 9(0,0)
  silkscreen extent -2.67,-2.55 2.05,3.2
SOT-23-6_L2.9-W1.6-P0.95-LS2.8-BL-2 [mil]
  rect 20.9x42.2 smd: 1(-37.4,-45.2) 2(0,-45.2) 3(37.4,-45.2) 4(37.4,45.2) 5(0,45.2) 6(-37.4,45.2)
  silkscreen extent -72,-57 61,35
SOT-223-3_L6.5-W3.4-P2.30-LS7.0-BR [mil]
  rect 98.4x43.3 smd: 1(116.9,-90.6) 2(116.9,0) 3(116.9,90.5)
  rect 92.1x141.7 smd: 4(-116.9,0)
  silkscreen extent -62,-131 54,131
TF-SMD_TF-PUSH [mil]
  rect 27.6x63 smd: 1(88.6,208.7) 2(45.3,208.7) 3(2,208.7) 4(-41.3,208.7) 5(-84.6,208.7) 6(-128,208.7) 7(-171.3,208.7) 8(-214.6,208.7) CD(-257.9,208.7)
  rect 47.2x59.1 smd: 10(-305.1,169.3)
  rect 47.2x86.6 smd: 11(-305.1,-208.7) 12(305.1,-208.7)
  rect 63x59.1 smd: 13(269.7,169.3)
  Board Outline Layer lines w0.1: 143.7,-224.4 143.3,-228.6 142.2,-232.7 140.4,-236.5 137.9,-240 134.8,-242.9 131.3,-245.2 127.4,-246.9 123.3,-247.8 119,-248 114.8,-247.4 110.8,-246.1 107.1,-244.1 103.8,-241.5 101,-238.3 98.8,-234.7 97.3,-230.7 96.6,-226.5 96.6,-222.3 97.3,-218.1 98.8,-214.2 101,-210.5 103.8,-207.3 107.1,-204.7 110.8,-202.7 114.8,-201.4 119,-200.8 123.3,-201 127.4,-201.9 131.3,-203.6 134.8,-205.9 137.9,-208.9 140.4,-212.3 142.2,-216.1 143.3,-220.2 143.7,-224.4 ; -171.3,-224.4 -171.6,-228.6 -172.8,-232.7 -174.6,-236.5 -177.1,-240 -180.2,-242.9 -183.7,-245.2 -187.6,-246.9 -191.7,-247.8 -195.9,-248 -200.1,-247.4 -204.2,-246.1 -207.9,-244.1 -211.2,-241.5 -214,-238.3 -216.2,-234.7 -217.7,-230.7 -218.4,-226.5 -218.4,-222.3 -217.7,-218.1 -216.2,-214.2 -214,-210.5 -211.2,-207.3 -207.9,-204.7 -204.2,-202.7 -200.1,-201.4 -195.9,-200.8 -191.7,-201 -187.6,-201.9 -183.7,-203.6 -180.2,-205.9 -177.1,-208.9 -174.6,-212.3 -172.8,-216.1 -171.6,-220.2 -171.3,-224.4
  Board Outline Layer region: -171.3,-224.4 -171.6,-228.6 -172.8,-232.7 -174.6,-236.5 -177.1,-240 -180.2,-242.9 -183.7,-245.2 -187.6,-246.9 -191.7,-247.8 -195.9,-248 -200.1,-247.4 -204.2,-246.1 -207.9,-244.1 -211.2,-241.5 -214,-238.3 -216.2,-234.7 -217.7,-230.7 -218.4,-226.5 -218.4,-222.3 -217.7,-218.1 -216.2,-214.2 -214,-210.5 -211.2,-207.3 -207.9,-204.7 -204.2,-202.7 -200.1,-201.4 -195.9,-200.8 -191.7,-201 -187.6,-201.9 -183.7,-203.6 -180.2,-205.9 -177.1,-208.9 -174.6,-212.3 -172.8,-216.1 -171.6,-220.2
  Board Outline Layer region: -171.3,-224.4 -171.6,-228.6 -172.8,-232.7 -174.6,-236.5 -177.1,-240 -180.2,-242.9 -183.7,-245.2 -187.6,-246.9 -191.7,-247.8 -195.9,-248 -200.1,-247.4 -204.2,-246.1 -207.9,-244.1 -211.2,-241.5 -214,-238.3 -216.2,-234.7 -217.7,-230.7 -218.4,-226.5 -218.4,-222.3 -217.7,-218.1 -216.2,-214.2 -214,-210.5 -211.2,-207.3 -207.9,-204.7 -204.2,-202.7 -200.1,-201.4 -195.9,-200.8 -191.7,-201 -187.6,-201.9 -183.7,-203.6 -180.2,-205.9 -177.1,-208.9 -174.6,-212.3 -172.8,-216.1 -171.6,-220.2
  Board Outline Layer region: 143.7,-224.4 143.3,-228.6 142.2,-232.7 140.4,-236.5 137.9,-240 134.8,-242.9 131.3,-245.2 127.4,-246.9 123.3,-247.8 119,-248 114.8,-247.4 110.8,-246.1 107.1,-244.1 103.8,-241.5 101,-238.3 98.8,-234.7 97.3,-230.7 96.6,-226.5 96.6,-222.3 97.3,-218.1 98.8,-214.2 101,-210.5 103.8,-207.3 107.1,-204.7 110.8,-202.7 114.8,-201.4 119,-200.8 123.3,-201 127.4,-201.9 131.3,-203.6 134.8,-205.9 137.9,-208.9 140.4,-212.3 142.2,-216.1 143.3,-220.2
  Board Outline Layer region: 143.7,-224.4 143.3,-228.6 142.2,-232.7 140.4,-236.5 137.9,-240 134.8,-242.9 131.3,-245.2 127.4,-246.9 123.3,-247.8 119,-248 114.8,-247.4 110.8,-246.1 107.1,-244.1 103.8,-241.5 101,-238.3 98.8,-234.7 97.3,-230.7 96.6,-226.5 96.6,-222.3 97.3,-218.1 98.8,-214.2 101,-210.5 103.8,-207.3 107.1,-204.7 110.8,-202.7 114.8,-201.4 119,-200.8 123.3,-201 127.4,-201.9 131.3,-203.6 134.8,-205.9 137.9,-208.9 140.4,-212.3 142.2,-216.1 143.3,-220.2
  Multi-Layer board cut-out: -171.3,-224.4 -171.6,-228.6 -172.8,-232.7 -174.6,-236.5 -177.1,-240 -180.2,-242.9 -183.7,-245.2 -187.6,-246.9 -191.7,-247.8 -195.9,-248 -200.1,-247.4 -204.2,-246.1 -207.9,-244.1 -211.2,-241.5 -214,-238.3 -216.2,-234.7 -217.7,-230.7 -218.4,-226.5 -218.4,-222.3 -217.7,-218.1 -216.2,-214.2 -214,-210.5 -211.2,-207.3 -207.9,-204.7 -204.2,-202.7 -200.1,-201.4 -195.9,-200.8 -191.7,-201 -187.6,-201.9 -183.7,-203.6 -180.2,-205.9 -177.1,-208.9 -174.6,-212.3 -172.8,-216.1 -171.6,-220.2
  Multi-Layer board cut-out: 143.7,-224.4 143.3,-228.6 142.2,-232.7 140.4,-236.5 137.9,-240 134.8,-242.9 131.3,-245.2 127.4,-246.9 123.3,-247.8 119,-248 114.8,-247.4 110.8,-246.1 107.1,-244.1 103.8,-241.5 101,-238.3 98.8,-234.7 97.3,-230.7 96.6,-226.5 96.6,-222.3 97.3,-218.1 98.8,-214.2 101,-210.5 103.8,-207.3 107.1,-204.7 110.8,-202.7 114.8,-201.4 119,-200.8 123.3,-201 127.4,-201.9 131.3,-203.6 134.8,-205.9 137.9,-208.9 140.4,-212.3 142.2,-216.1 143.3,-220.2
  silkscreen extent -286,-382 315,209
TYPE-C-SMD_LAIL-TYPE-C-16PIN-08-WT#1 [mil]
  oval 39.4x82.7 hole 23.6 slot 66.9 at 90 deg paste+0 mask+2: 13(170.1,71.1) 16(-170.1,71.1)
  oval 39.4x70.9 hole 23.6 slot 55.1 at 90 deg paste+0 mask+2: 14(170.1,-93.5) 15(-170.1,-93.5)
  rect 23.6x44.9 smd paste-3937 mask+2: A1B12(-126,93.5) A4B9(-94.5,93.5) B1A12(126,93.5) B4A9(94.5,93.5)
  rect 11.8x44.9 smd paste-3937 mask+2: A5(-49.2,93.5) A6(-9.8,93.5) A7(9.8,93.5) A8(49.2,93.5) B5(68.9,93.5) B6(29.5,93.5) B7(-29.5,93.5) B8(-68.9,93.5)
  Board Outline Layer lines w0.1: 126.6,51.4 126.2,48.3 125.1,45.4 123.4,42.9 121,40.8 118.3,39.4 115.3,38.7 112.2,38.7 109.2,39.4 106.5,40.8 104.2,42.9 102.5,45.4 101.4,48.3 101,51.4 101.4,54.4 102.5,57.3 104.2,59.9 106.5,61.9 109.2,63.3 112.2,64.1 115.3,64.1 118.3,63.3 121,61.9 123.4,59.9 125.1,57.3 126.2,54.4 126.6,51.4 ; -101,51.4 -101.4,48.3 -102.5,45.4 -104.2,42.9 -106.5,40.8 -109.2,39.4 -112.2,38.7 -115.3,38.7 -118.3,39.4 -121,40.8 -123.4,42.9 -125.1,45.4 -126.2,48.3 -126.6,51.4 -126.2,54.4 -125.1,57.3 -123.4,59.9 -121,61.9 -118.3,63.3 -115.3,64.1 -112.2,64.1 -109.2,63.3 -106.5,61.9 -104.2,59.9 -102.5,57.3 -101.4,54.4 -101,51.4
  Board Outline Layer region: -101,51.4 -101.4,48.3 -102.5,45.4 -104.2,42.9 -106.5,40.8 -109.2,39.4 -112.2,38.7 -115.3,38.7 -118.3,39.4 -121,40.8 -123.4,42.9 -125.1,45.4 -126.2,48.3 -126.6,51.4 -126.2,54.4 -125.1,57.3 -123.4,59.9 -121,61.9 -118.3,63.3 -115.3,64.1 -112.2,64.1 -109.2,63.3 -106.5,61.9 -104.2,59.9 -102.5,57.3 -101.4,54.4
  Board Outline Layer region: -101,51.4 -101.4,48.3 -102.5,45.4 -104.2,42.9 -106.5,40.8 -109.2,39.4 -112.2,38.7 -115.3,38.7 -118.3,39.4 -121,40.8 -123.4,42.9 -125.1,45.4 -126.2,48.3 -126.6,51.4 -126.2,54.4 -125.1,57.3 -123.4,59.9 -121,61.9 -118.3,63.3 -115.3,64.1 -112.2,64.1 -109.2,63.3 -106.5,61.9 -104.2,59.9 -102.5,57.3 -101.4,54.4
  Board Outline Layer region: 126.6,51.4 126.2,48.3 125.1,45.4 123.4,42.9 121,40.8 118.3,39.4 115.3,38.7 112.2,38.7 109.2,39.4 106.5,40.8 104.2,42.9 102.5,45.4 101.4,48.3 101,51.4 101.4,54.4 102.5,57.3 104.2,59.9 106.5,61.9 109.2,63.3 112.2,64.1 115.3,64.1 118.3,63.3 121,61.9 123.4,59.9 125.1,57.3 126.2,54.4
  Board Outline Layer region: 126.6,51.4 126.2,48.3 125.1,45.4 123.4,42.9 121,40.8 118.3,39.4 115.3,38.7 112.2,38.7 109.2,39.4 106.5,40.8 104.2,42.9 102.5,45.4 101.4,48.3 101,51.4 101.4,54.4 102.5,57.3 104.2,59.9 106.5,61.9 109.2,63.3 112.2,64.1 115.3,64.1 118.3,63.3 121,61.9 123.4,59.9 125.1,57.3 126.2,54.4
  Multi-Layer board cut-out: -101,51.4 -101.4,48.3 -102.5,45.4 -104.2,42.9 -106.5,40.8 -109.2,39.4 -112.2,38.7 -115.3,38.7 -118.3,39.4 -121,40.8 -123.4,42.9 -125.1,45.4 -126.2,48.3 -126.6,51.4 -126.2,54.4 -125.1,57.3 -123.4,59.9 -121,61.9 -118.3,63.3 -115.3,64.1 -112.2,64.1 -109.2,63.3 -106.5,61.9 -104.2,59.9 -102.5,57.3 -101.4,54.4
  Multi-Layer board cut-out: 126.6,51.4 126.2,48.3 125.1,45.4 123.4,42.9 121,40.8 118.3,39.4 115.3,38.7 112.2,38.7 109.2,39.4 106.5,40.8 104.2,42.9 102.5,45.4 101.4,48.3 101,51.4 101.4,54.4 102.5,57.3 104.2,59.9 106.5,61.9 109.2,63.3 112.2,64.1 115.3,64.1 118.3,63.3 121,61.9 123.4,59.9 125.1,57.3 126.2,54.4
  silkscreen extent -176,-195 176,21
TYPE-C-SMD_LAIL-TYPE-C-16PIN-08-WT#2 [mil]
  oval 39.4x82.7 hole 23.6 slot 66.9 at 90 deg paste+0 mask+2: 13(170.1,71) 16(-170.1,71)
  oval 39.4x70.9 hole 23.6 slot 55.1 at 90 deg paste+0 mask+2: 14(170.1,-93.5) 15(-170.1,-93.5)
  rect 23.6x44.9 smd paste-3937 mask+2: A1B12(-126,93.5) A4B9(-94.5,93.5) B1A12(126,93.5) B4A9(94.5,93.5)
  rect 11.8x44.9 smd paste-3937 mask+2: A5(-49.2,93.5) A6(-9.9,93.5) A7(9.8,93.5) A8(49.2,93.5) B5(68.9,93.5) B6(29.5,93.5) B7(-29.5,93.5) B8(-68.9,93.5)
  Board Outline Layer lines w0.1: 115.3,38.6 118.3,39.4 121,40.8 123.4,42.9 125.1,45.4 126.2,48.3 126.6,51.3 126.2,54.4 125.1,57.3 123.4,59.8 121,61.9 118.3,63.3 115.3,64 112.2,64 109.2,63.3 106.5,61.9 104.2,59.8 102.4,57.3 101.4,54.4 101,51.3 101.4,48.3 102.4,45.4 104.2,42.9 106.5,40.8 109.2,39.4 112.2,38.6 115.3,38.6 ; -112.2,38.6 -109.2,39.4 -106.5,40.8 -104.2,42.9 -102.5,45.4 -101.4,48.3 -101,51.3 -101.4,54.4 -102.5,57.3 -104.2,59.8 -106.5,61.9 -109.2,63.3 -112.2,64 -115.3,64 -118.3,63.3 -121.1,61.9 -123.4,59.8 -125.1,57.3 -126.2,54.4 -126.6,51.3 -126.2,48.3 -125.1,45.4 -123.4,42.9 -121.1,40.8 -118.3,39.4 -115.3,38.6 -112.2,38.6
  Board Outline Layer region: -101,51.3 -101.4,48.3 -102.5,45.4 -104.2,42.9 -106.5,40.8 -109.2,39.4 -112.2,38.6 -115.3,38.6 -118.3,39.4 -121.1,40.8 -123.4,42.9 -125.1,45.4 -126.2,48.3 -126.6,51.3 -126.2,54.4 -125.1,57.3 -123.4,59.8 -121.1,61.9 -118.3,63.3 -115.3,64 -112.2,64 -109.2,63.3 -106.5,61.9 -104.2,59.8 -102.5,57.3 -101.4,54.4
  Board Outline Layer region: -101,51.3 -101.4,48.3 -102.5,45.4 -104.2,42.9 -106.5,40.8 -109.2,39.4 -112.2,38.6 -115.3,38.6 -118.3,39.4 -121.1,40.8 -123.4,42.9 -125.1,45.4 -126.2,48.3 -126.6,51.3 -126.2,54.4 -125.1,57.3 -123.4,59.8 -121.1,61.9 -118.3,63.3 -115.3,64 -112.2,64 -109.2,63.3 -106.5,61.9 -104.2,59.8 -102.5,57.3 -101.4,54.4
  Board Outline Layer region: 126.6,51.3 126.2,48.3 125.1,45.4 123.4,42.9 121,40.8 118.3,39.4 115.3,38.6 112.2,38.6 109.2,39.4 106.5,40.8 104.2,42.9 102.4,45.4 101.4,48.3 101,51.3 101.4,54.4 102.4,57.3 104.2,59.8 106.5,61.9 109.2,63.3 112.2,64 115.3,64 118.3,63.3 121,61.9 123.4,59.8 125.1,57.3 126.2,54.4
  Board Outline Layer region: 126.6,51.3 126.2,48.3 125.1,45.4 123.4,42.9 121,40.8 118.3,39.4 115.3,38.6 112.2,38.6 109.2,39.4 106.5,40.8 104.2,42.9 102.4,45.4 101.4,48.3 101,51.3 101.4,54.4 102.4,57.3 104.2,59.8 106.5,61.9 109.2,63.3 112.2,64 115.3,64 118.3,63.3 121,61.9 123.4,59.8 125.1,57.3 126.2,54.4
  Multi-Layer board cut-out: -101,51.3 -101.4,48.3 -102.5,45.4 -104.2,42.9 -106.5,40.8 -109.2,39.4 -112.2,38.6 -115.3,38.6 -118.3,39.4 -121.1,40.8 -123.4,42.9 -125.1,45.4 -126.2,48.3 -126.6,51.3 -126.2,54.4 -125.1,57.3 -123.4,59.8 -121.1,61.9 -118.3,63.3 -115.3,64 -112.2,64 -109.2,63.3 -106.5,61.9 -104.2,59.8 -102.5,57.3 -101.4,54.4
  Multi-Layer board cut-out: 126.6,51.3 126.2,48.3 125.1,45.4 123.4,42.9 121,40.8 118.3,39.4 115.3,38.6 112.2,38.6 109.2,39.4 106.5,40.8 104.2,42.9 102.4,45.4 101.4,48.3 101,51.3 101.4,54.4 102.4,57.3 104.2,59.8 106.5,61.9 109.2,63.3 112.2,64 115.3,64 118.3,63.3 121,61.9 123.4,59.8 125.1,57.3 126.2,54.4
  silkscreen extent -176,-196 176,21
WIRELM-SMD_ESP32-S3-WROOM-1 [mil]
  rect 59.1x35.4 smd paste+0 mask+2: 1(-344.5,350.2) 2(-344.5,300.2) 3(-344.5,250.2) 4(-344.5,200.2) 5(-344.5,150.2) 6(-344.5,100.2) 7(-344.5,50.2) 8(-344.5,0.2) 9(-344.5,-49.8) 10(-344.5,-99.8) 11(-344.5,-149.8) 12(-344.5,-199.8) 13(-344.5,-249.8) 14(-344.5,-299.8) 27(344.5,-299.8) 28(344.5,-249.8) 29(344.5,-199.8) 30(344.5,-149.8) 31(344.5,-99.8) 32(344.5,-49.8) 33(344.5,0.2) 34(344.5,50.2) 35(344.5,100.2) 36(344.5,150.2) 37(344.5,200.2) 38(344.5,250.2) 39(344.5,300.2) 40(344.5,350.2)
  rect 35.4x59.1 smd paste+0 mask+2: 15(-275,-350.2) 16(-225,-350.2) 17(-175,-350.2) 18(-125,-350.2) 19(-75,-350.2) 20(-25,-350.2) 21(25,-350.2) 22(75,-350.2) 23(125,-350.2) 24(175,-350.2) 25(225,-350.2) 26(275,-349)
  rect 35.4x35.4 smd: 41(-114.1,-8.8) 41(-114.1,46.3) 41(-114.1,101.4) 41(-59,101.4) 41(-59,-8.8) 41(-59,46.3) 41(-3.9,101.4) 41(-3.9,46.3) 41(-3.9,-8.8)
  silkscreen extent -354,-360 355,646

## Via types
v1: diameter 24, hole 12, Top Layer to Bottom Layer, 165 vias

## Nets (pads, with @x,y where several pads share a name; then routed paths per layer and width w, separated by ;. In a path a pad name is that pad's centre, name@x,y a point inside that pad or via, vN(x,y) a via of type N, cw(c..) or ccw(c..) an arc to the next point about the centre after c; other vN are vias at no path point)
BAT/3V3: C209.2 C210.2 FPC201.6 FPC201.7 FPC201.8 R212.2 R213.1 R214.1 U202.1 U202.2 U203.2 | length 1463.4
  Top Layer w10: FPC201.7@12488.3,4381.7 12488.3,4235.5 R213.1@12512.9,4210.9
  Top Layer w20: U202.2@12772.6,4237.2 12797.6,4262.2 U202.1@12822.6,4237.2
  Top Layer w40: 12797.6,4270.9 v1@12797.6,4475.9
  Bottom Layer w20: 12447.6,4445.9 12462.6,4430.9 v1(12472.6,4430.9) ; v1(12502.6,4430.9) 12537.6,4465.9
  Bottom Layer w40: U203.2@12271.9,4086.5 12272.6,4085.9 12377.6,4085.9 12447.6,4155.9 12447.6,4445.9 12467.6,4465.9 ; 12537.6,4465.9 12467.6,4465.9 ; v1(12796.6,4475) v1(12761.6,4475) 12476.6,4475 12467.6,4465.9
BAT/$1N6: C209.1 R211.2 R212.1 U202.3 | length 185.9
  Top Layer w10: U202.3@12722.6,4237.2 12722.6,4398.5 C209.1@12740,4415.9
BAT/$1N13: R203.1 U201.12 | length 57.2
  Top Layer w10: U201.12@12743.1,3631.9 12773.9,3631.9 R203.1@12792.6,3650.6
BAT/$1N14: R203.2 R206.1 U201.11 | length 439.4
  Top Layer w10: U201.11@12743.1,3614.2 12769.6,3614.2 R203.2@12792.6,3591.2 12794.6,3591.2 v1(12819.3,3615.9) ; v1(12872.6,3885.9) 12887.9,3901.2 R206.1@12917.6,3901.2
  Bottom Layer w10: v1(12819.3,3615.9) 12872.6,3669.2 v1(12872.6,3885.9)
BAT/$1N16: R201.2 U201.22 | length 594.4
  Top Layer w10: v1(12565.1,3619.5) 12570.3,3614.2 U201.22@12613.1,3614.2 ; v1(12842.6,3592.2) R201.2@12842.6,3651.2
  Bottom Layer w10: v1(12565.1,3619.5) 12652.6,3532 12652.6,3485.9 12682.6,3455.9 12802.6,3455.9 12812.6,3465.9 12812.6,3562.2 v1(12842.6,3592.2)
BAT/$1N18: R202.1 U201.24 | length 112.9
  Top Layer w10: R202.1@12517.6,3596.2 12517.6,3578.8 U201.24@12613.1,3578.8
BAT/$1N30: C202.2 U201.8 | length 136.1
  Top Layer w10: U201.8@12743.1,3561 12832.4,3561 12842.6,3550.9 C202.2@12842.6,3518.5
BAT/$1N35: C204.1 U201.3 | length 92.2
  Top Layer w10: C204.1@12648.2,3455.9 12669.3,3477 U201.3@12669.3,3539.4
BAT/$1N51: Q201.6 R204.1 | length 69
  Top Layer w10: Q201.6@12555,3135.7 12602,3135.7 R204.1@12617.6,3151.2
BAT/$1N52: C203.1 Q201.1 R204.2 R205.1 | length 245.9
  Top Layer w10: R205.1@12507.6,3381.2 12507.6,3308.3 C203.1@12505.1,3305.9 12555,3256.1 Q201.1@12555,3226.1 12602,3226.1 R204.2@12617.6,3210.6